# Altium PCB PCB_Flex_LED_v2.1.PcbDoc
Units mm, origin at the board's own origin, x right, y up, seen from the top; angles counter-clockwise.
Board outline 9 x 56.97 mm, 2 copper layers (Top Layer, Bottom Layer), stack 0.095 mm thick; 5 components, 4 nets, 12 pads, 4 vias.
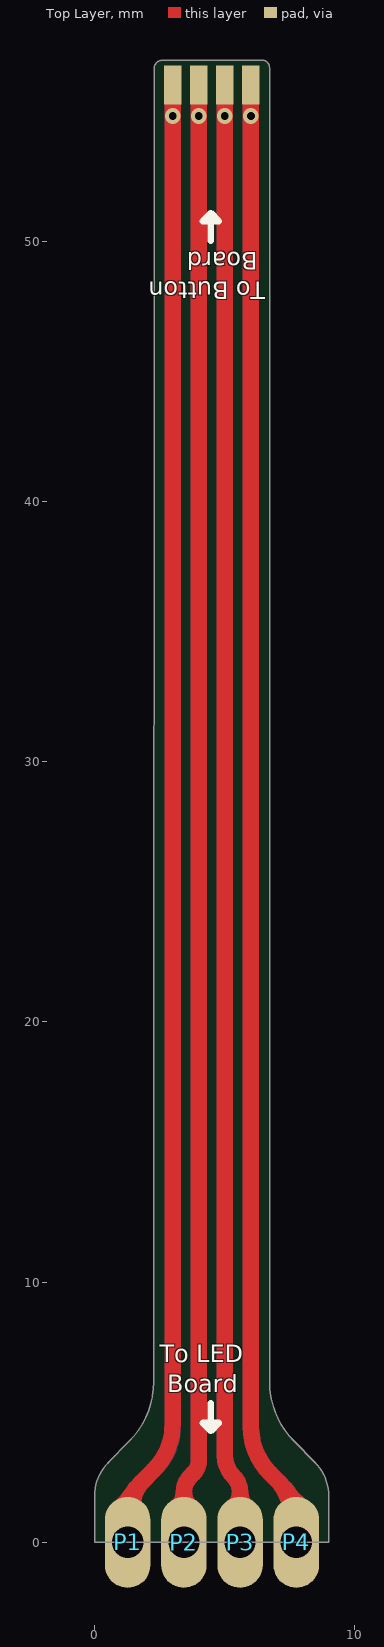
[diagram p0: Top Layer view]
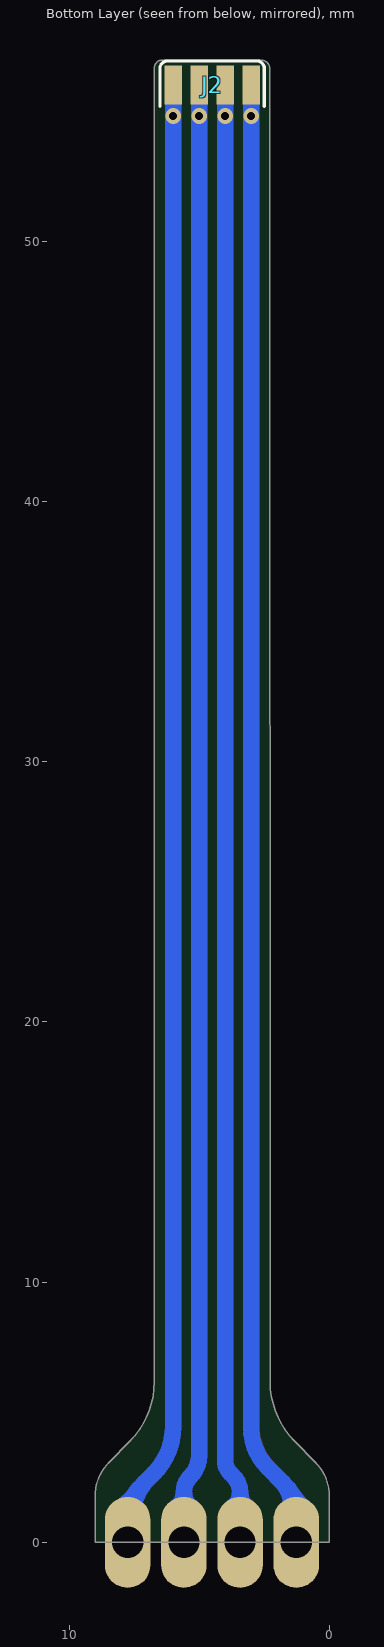
[diagram p1: Bottom Layer view, seen from below]

## Layer stack, top to bottom
Top Solder: solder mask 0.0127, Solder Resist, Dk 3.5
Top Layer: signal copper 0.035
Dielectric 1: core 0.0254, Polyimide, Dk 3.5
Bottom Layer: signal copper 0.035
Bottom Solder: solder mask 0.0127, Solder Resist, Dk 3.5

## Board outline
0,0 0,1.778 cw(c1.84,1.778) 0.539,3.079 1.326,3.883 ccw(c-0.961,6.17) 2.273,6.17 2.289,56.644 cw(c2.609,56.645) 2.603,56.965 6.442,56.965 6.442,56.967 cw(c6.437,56.681) 6.722,56.681 6.722,56.68 6.722,6.17 6.727,6.17 ccw(c9.961,6.17) 7.674,3.883 8.461,3.079 cw(c7.16,1.778) 9,1.778 9,0

## Design rules (kind name [scope] priority, off if disabled: settings)
Clearance [All] p1: gap=0.254 ignorepadtopadclearanceinfootprint=FALSE except(0: Arc-Hole Track-Hole SMDPad-Hole THPad-Hole Via-Hole Fill-Hole Poly-Hole Region-Hole Text-Hole)
ComponentClearance [All] p1: gap=0.127 collisioncheckmode=3 verticalgap=0.127 showdistances=FALSE
HoleToHoleClearance [All] p1: gap=0 allowstackedmicrovias=TRUE
MinimumSolderMaskSliver [All] p1: minsoldermaskwidth=0
PolygonConnect [All] p1: connectstyle=Relief reliefconductorwidth=0.254 reliefentries=4 polygonreliefangle="90 Angle" airgapwidth=0.254
RoutingVias [All] p1: holewidth=0.3 width=0.6 viastyle="Through Hole" minholewidth=0.3 minwidth=0.6 maxholewidth=0.3 maxwidth=0.6
SilkToSilkClearance [All] p1: silktosilkclearance=0
SilkToSolderMaskClearance [IsPad] p1: minsilkscreentomaskgap=0 clearancetoexposedcopper=TRUE
SolderMaskExpansion [All] p1: expansion=0.102 istentingtop=FALSE
Width [All] p1: maxlimit=0.635 minlimit=0.254 preferedwidth=0.254 minimp=50.000000 maximp=50.000000 favimp=50.000000
25 further rules are at their usual default settings.

## Components (designator, comment, footprint, x,y, rotation, side; value= is the part's Value field where it differs from the comment)
J2 "1mm FPC" "FPC-1MM-4P - NEW" 4.505,56.141 r180 bottom
P1 "0.5mm Test Pad" "0.5mm Test Pad" 1.27,0 r270 top
P2 "0.5mm Test Pad" "0.5mm Test Pad" 3.43,0 r270 top
P3 "0.5mm Test Pad" "0.5mm Test Pad" 5.59,0 r270 top
P4 "0.5mm Test Pad" "0.5mm Test Pad" 7.75,0 r270 top

## Footprints (in the part's own frame and the unit in brackets; to place one, negate y for a bottom-side part, rotate by r counter-clockwise, add the part's x,y. Pads: shape width x height; smd on the part's side, far side on the other; paste and mask are expansions set on the pad)
"0.5mm Test Pad" [mm]
  oval 3.5x1.75 hole 1.2: 1(0,0)
"FPC-1MM-4P - NEW" [mm]
  rect 0.67x1.5 smd paste+0: 1(1.5,-0.127) 2(0.5,-0.127) 3(-0.5,-0.127) 4(-1.5,-0.127)
  silkscreen extent -2.01,-0.95 2.01,0.8

## Part data
J2: library part FPC-1mm-4P-New, "1mm Pitch 4P FPC"
P1 P2 P3 P4: "Test pad"

## Free pads (board coordinates)
  rect 0.67x1.5 smd paste+0: 2(3.005,56.014) 2(4.005,56.014) 2(5.005,56.014) 2(6.005,56.014)

## Via types
v1: diameter 0.6, hole 0.3, Top Layer to Bottom Layer, 4 vias

## Nets (pads, with @x,y where several pads share a name; then routed paths per layer and width w, separated by ;. In a path a pad name is that pad's centre, name@x,y a point inside that pad or via, vN(x,y) a via of type N, cw(c..) or ccw(c..) an arc to the next point about the centre after c; other vN are vias at no path point)
NetJ2_1: J2.1 P1.1 pad.2@3.005,56.014 | length 112.1
  Top Layer w0.635: P1.1 1.27,1.06 cw(c3.004,1.06) 1.778,2.286 2.261,2.769 ccw(c0.465,4.565) 3.005,4.565 3.005,4.865 v1(3.005,54.82) pad.2@3.005,56.014
  Bottom Layer w0.635: P1.1@1.27,1.06 cw(c3.004,1.06) 1.778,2.286 2.366,2.874 ccw(c0.828,4.415) 3.005,4.415 v1(3.005,54.82) J2.1
NetJ2_2: J2.2 P2.1 pad.2@4.005,56.014 | length 112.3
  Top Layer w0.635: P2.1 3.43,1.921 cw(c4.305,1.921) 3.686,2.54 3.805,2.659 ccw(c3.323,3.141) 4.005,3.141 ; 4.005,3.141 v1(4.005,54.82) pad.2@4.005,56.014
  Bottom Layer w0.635: P2.1 3.43,1.921 cw(c4.305,1.921) 3.686,2.54 3.805,2.659 ccw(c3.323,3.141) 4.005,3.141 v1(4.005,54.82) J2.2@4.005,55.963
NetJ2_3: J2.3 P3.1 pad.2@5.005,56.014 | length 112.3
  Top Layer w0.635: pad.2@5.005,56.014 v1(5.005,54.82) 5.005,4.865 5.005,3.335 ccw(c6.129,3.335) 5.334,2.54 cw(c4.715,1.921) 5.59,1.921 P3.1
  Bottom Layer w0.635: J2.3@5.005,55.987 v1(5.005,54.82) 5.005,4.865 5.005,3.335 ccw(c6.129,3.335) 5.334,2.54 cw(c4.715,1.921) 5.59,1.921 P3.1
NetJ2_4: J2.4 P4.1 pad.2@6.005,56.014 | length 112.3
  Top Layer w0.635: pad.2@6.005,56.014 v1(6.005,54.82) 6.005,4.865 6.005,4.445 ccw(c8.545,4.445) 6.749,2.649 7.112,2.286 cw(c5.571,0.745) 7.75,0.745 P4.1
  Bottom Layer w0.635: J2.4 v1(6.005,54.82) 6.005,4.445 ccw(c8.545,4.445) 6.749,2.649 7.112,2.286 cw(c5.571,0.745) P4.1@7.75,0.745

## Polygon pours and split planes (outlines as drawn)
no net on Fabrication info "NONET_L-01_P-001" (solid): 6.721,54.366 6.721,56.682 ccw(c6.407,56.682) 6.407,56.996 2.572,56.996 ccw(c2.572,56.712) 2.288,56.712 2.288,54.366

## Silkscreen, mask and mechanical layers (free items; w line width, h text height)
Top Overlay:
  lines w0.254: 4.469,5.341 4.469,4.281 ; 4.469,50.027 4.469,51.086 ; 4.469,4.281 4.774,4.586 4.164,4.586 4.469,4.281 ; 4.469,51.086 4.164,50.781 4.774,50.781 4.469,51.086
  text "To Button /  Board" at 6.559,49.82 h1.14 r180
  text "To LED /  Board" at 2.508,5.546 h1.14
Board Outline:
  lines w0.254: 6.442,56.965 2.603,56.965 ccw(c2.609,56.645) 2.289,56.644 2.273,6.17 cw(c-0.961,6.17) 1.326,3.883 0.539,3.079 ccw(c1.84,1.778) 0,1.778 0,0 9,0 9,1.778 ccw(c7.16,1.778) 8.461,3.079 7.674,3.883 cw(c9.961,6.17) 6.727,6.17 ; 6.442,56.967 cw(c6.437,56.681) 6.722,56.681 6.722,6.17
Fabrication info:
  drawing of 195 lines, arcs and shapes, not listed
  text "Layer" at 102.408,59.272 h1.52
  text "Name" at 112.82,59.272 h1.52
  text "Material" at 136.436,59.272 h1.52
  text "Thickness" at 158.274,59.272 h1.52
  text "Constant" at 174.779,59.272 h1.52
  text "Board Layer Stack" at 189.254,59.272 h1.52
  text "Top Overlay" at 112.82,56.224 h1.52
  text "Top Solder" at 112.82,53.176 h1.52
  text "Solder Resist" at 136.436,53.176 h1.52
  text "0.50mil" at 158.274,53.176 h1.52
  text "3.5" at 174.779,53.176 h1.52
  text "Stiffener Area: 2.6mm" at 13.83,53.024 h1.52
  text "1" at 102.408,50.128 h1.52
  text "Top Layer" at 112.82,50.128 h1.52
  text "1.38mil" at 158.274,50.128 h1.52
  text "Dielectric 1" at 112.82,47.08 h1.52
  text "Polyimide" at 136.436,47.08 h1.52
  text "1.00mil" at 158.274,47.08 h1.52
  text "3.5" at 174.779,47.08 h1.52
  text "2" at 102.408,44.032 h1.52
  text "Bottom Layer" at 112.82,44.032 h1.52
  text "1.38mil" at 158.274,44.032 h1.52
  text "Bottom Solder" at 112.82,40.984 h1.52
  text "Solder Resist" at 136.436,40.984 h1.52
  text "0.50mil" at 158.274,40.984 h1.52
  text "3.5" at 174.779,40.984 h1.52
  text "Bottom Overlay" at 112.82,37.936 h1.52
  text "Note:" at 11.538,37.531 h1.52
  text "Total board thickness:" at 102.408,34.888 h1.52
  text "4.76mil" at 158.274,34.888 h1.52
  text "Stiffener Material: Polyimide" at 11.386,34.61 h1.52
  text "Stiffener Thickness: 0.225 mm" at 11.418,32.172 h1.52
  text "Stiffener side: Bottom side of PCB" at 11.394,29.987 h1.52
  text "Total Thickness of PCB (0.3mm): Stiffener thickness + Layer Stackup thickness." at 11.181,18.988 h1.52
  text "Stiffener Area: 2.6mm" at 16.263,0.904 h1.52
Drill Drawing:
  circle w0.254: c8.537,71.892 r0.847
  lines w0.254: 7.69,74.855 9.384,74.855 9.384,76.548 7.69,76.548 7.69,74.855
  lines w0.381: 6.172,69.902 223.79,69.902 ; 6.172,77.522 223.79,77.522 ; 20.164,66.092 20.164,81.332 ; 32.353,66.092 32.353,81.332 ; 60.031,66.092 60.031,81.332 ; 72.88,66.092 72.88,81.332 ; 91.519,66.092 91.519,81.332 ; 129.607,66.092 129.607,81.332 ; 144.589,66.092 144.589,81.332 ; 163.533,66.092 163.533,81.332 ; 188.164,66.092 188.164,81.332 ; 6.172,66.092 223.79,66.092 223.79,81.332 6.172,81.332 6.172,66.092
  text "Symbol" at 8.458,78.665 h1.83
  text "Count" at 21.307,78.665 h1.83
  text "Hole Size" at 33.496,78.665 h1.83
  text "Plated" at 61.174,78.665 h1.83
  text "Hole Type" at 74.023,78.665 h1.83
  text "Drill Layer Pair" at 92.662,78.665 h1.83
  text "Via/Pad" at 130.75,78.665 h1.83
  text "Pad Shape" at 145.732,78.665 h1.83
  text "Template" at 164.676,78.665 h1.83
  text "Routed Path Length" at 189.307,78.665 h1.83
  text "4" at 21.307,74.855 h1.52
  text "11.81mil (0.300mm)" at 33.496,74.855 h1.52
  text "PTH" at 61.174,74.855 h1.52
  text "Round" at 74.023,74.855 h1.52
  text "Top Layer - Bottom Layer" at 92.662,74.855 h1.52
  text "Via" at 130.75,74.855 h1.52
  text "Rounded" at 145.732,74.855 h1.52
  text "v60h30" at 164.676,74.855 h1.52
  text "-" at 189.307,74.855 h1.52
  text "4" at 21.307,71.045 h1.52
  text "47.24mil (1.200mm)" at 33.496,71.045 h1.52
  text "PTH" at 61.174,71.045 h1.52
  text "Round" at 74.023,71.045 h1.52
  text "Top Layer - Bottom Layer" at 92.662,71.045 h1.52
  text "Pad" at 130.75,71.045 h1.52
  text "Rounded" at 145.732,71.045 h1.52
  text "r350_175h120r88" at 164.676,71.045 h1.52
  text "-" at 189.307,71.045 h1.52
  text "8 Total" at 21.307,67.235 h1.52